# Altium PCB PCB.PcbDoc
Units mm, origin at the board's own origin, x right, y up, seen from the top; angles counter-clockwise.
Board outline 47.25 x 18.25 mm, 2 copper layers (Top Layer, Bottom Layer); 8 components, 7 nets, 24 pads, 1 vias.
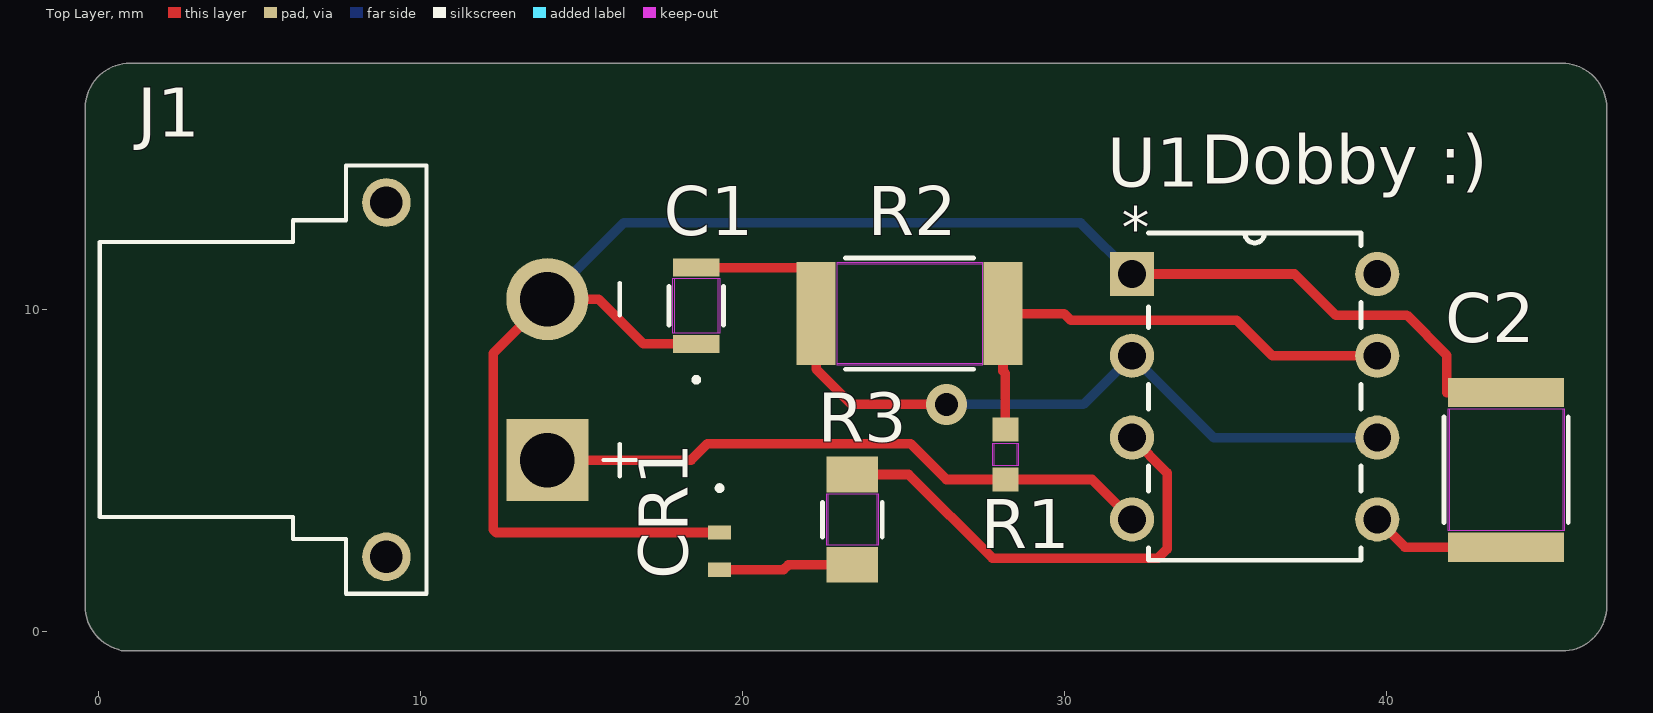
[diagram p0: Top Layer view]
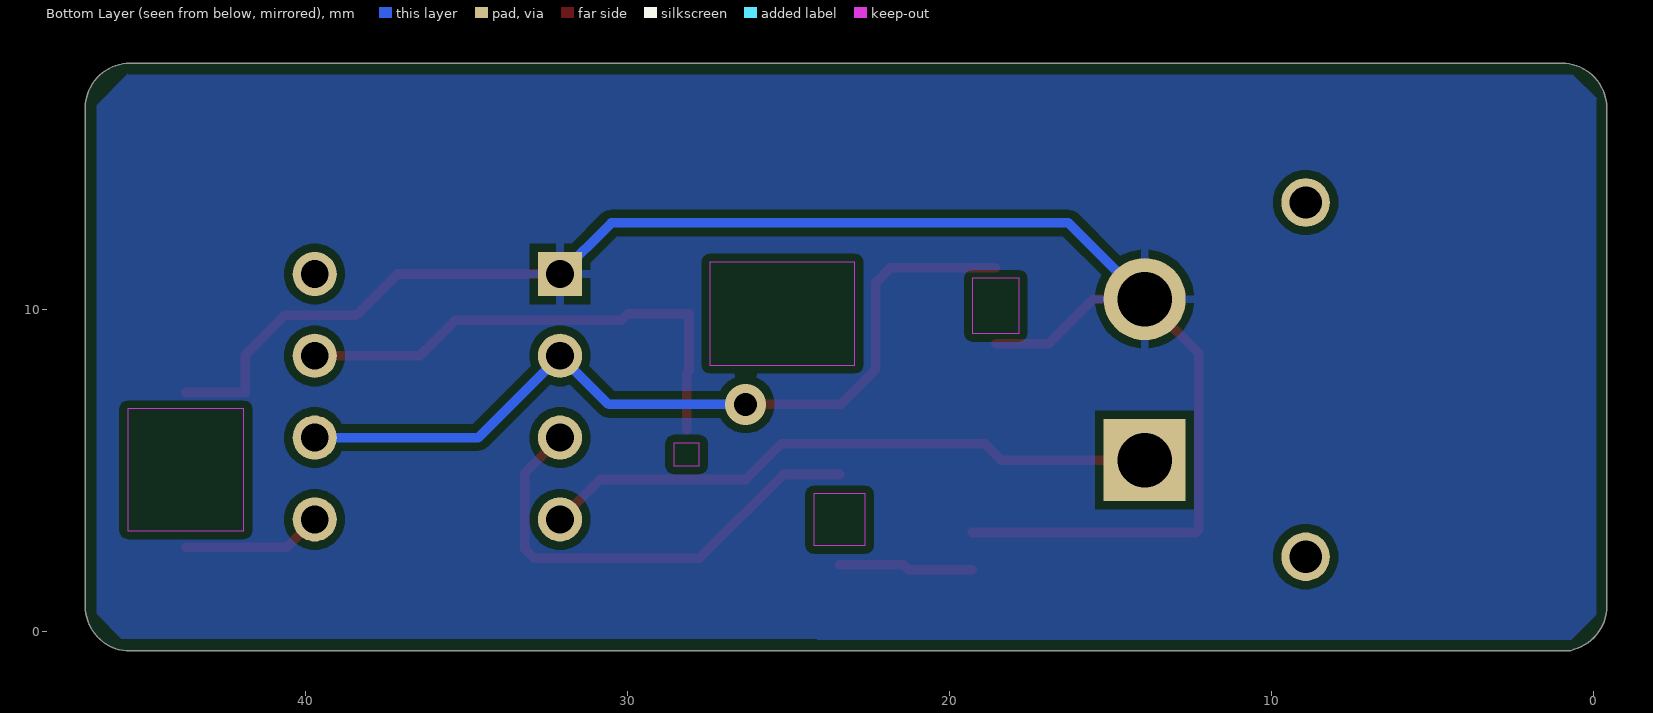
[diagram p1: Bottom Layer view, seen from below]
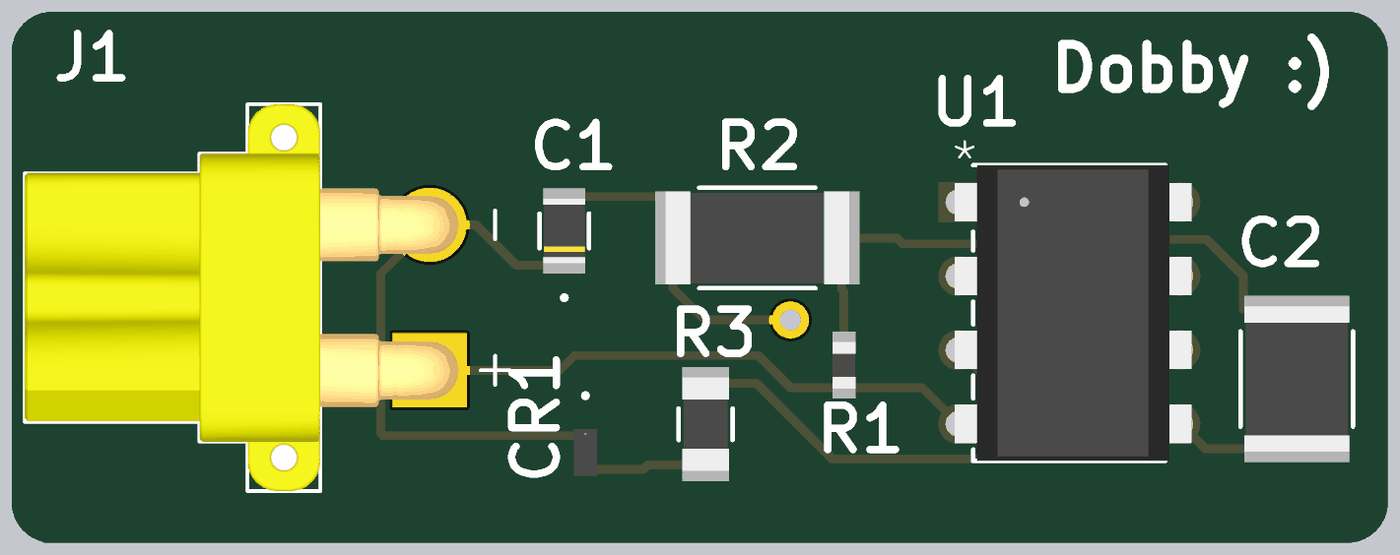
[diagram p2: 3D render of the assembled board from above, using the file's embedded part models]

## Layer stack, top to bottom
Top Solder: solder mask 0.0102, Solder Resist, Dk 3.5
Top Layer: signal copper 0.0356
Dielectric 1: dielectric 0.32, FR-4, Dk 4.8
Bottom Layer: signal copper 0.0356
Bottom Solder: solder mask 0.0102, Solder Resist, Dk 3.5

## Board outline
-0.427,0.795 ccw(c0.97,0.795) 0.599,-0.552 0.7,-0.602 45.43,-0.602 ccw(c45.43,0.795) 46.827,0.795 46.827,16.255 ccw(c45.43,16.255) 45.43,17.652 0.97,17.652 ccw(c0.97,16.255) -0.427,16.255

## Design rules (kind name [scope] priority, off if disabled: settings)
Clearance [All] p1: gap=0.05 ignorepadtopadclearanceinfootprint=FALSE
PolygonConnect [All] p1: connectstyle=Relief reliefconductorwidth=0.254 reliefentries=4 polygonreliefangle="90 Angle" airgapwidth=0.254
RoutingVias [All] p1: holewidth=0.711 width=1.27 viastyle="Through Hole" minholewidth=0.711 minwidth=1.27 maxholewidth=0.711 maxwidth=1.27
SilkToSilkClearance [All] p1: silktosilkclearance=0.02
SilkToSolderMaskClearance [IsPad] p1: minsilkscreentomaskgap=0.02 clearancetoexposedcopper=TRUE
SolderMaskExpansion [All] p1: expansion=0.102 istentingtop=FALSE
Width [All] p1: maxlimit=0.5 minlimit=0.05 preferedwidth=0.3
28 further rules are at their usual default settings.

## Components (designator, comment, footprint, x,y, rotation, side; value= is the part's Value field where it differs from the comment)
C1 "10 uF" CAP_2012_TDK 18.55,10.119 r90 top
C2 "0.01 uF" CAP_ECWU_E1_PAN 43.7,5.025 r270 top
CR1 "LED" LED_DIALIGHT_598_DIA 19.275,2.5 r270 top
J1 "XT30PW-F" AMASS_XT30PW-F 8.925,7.825 r270 top
R1 "3.9 K" RC0603N_PAN 28.15,5.5 r90 top
R2 "6.8 K" RC2512N_PAN 25.175,9.875 r180 top
R3 "1 K" RC1206N_PAN 23.4,3.475 r270 top
U1 "NE555P" P8 39.7,3.485 r0 top

## Footprints (in the part's own frame and the unit in brackets; to place one, negate y for a bottom-side part, rotate by r counter-clockwise, add the part's x,y. Pads: shape width x height; smd on the part's side, far side on the other; paste and mask are expansions set on the pad)
AMASS_XT30PW-F [mm]
  round 2.55 hole 1.7: N(-2.5,5)
  rect 2.55x2.55 / inner round 2.55 / far side rect 2.55x2.55 hole 1.7: P(2.5,5)
  round 1.508 hole 1: S1(5.5,0) S2(-5.5,0)
  silkscreen extent -6.65,-8.9 6.65,7.75, body extent -6.65,-8.9 6.65,6, height 5
CAP_2012_TDK [mil]
  rect 22x57 smd paste+0 mask+0: 1(-46.5,0) 2(46.5,0)
  Top Layer keep-out region: -33.5,-26.5 -33.5,26.5 33.5,26.5 33.5,-26.5
  Keep-Out Layer region: -33.5,-28.5 -33.5,28.5 33.5,28.5 33.5,-28.5
  silkscreen extent -93,-34 23,33, body extent -44,-29 44,29, height 49
CAP_ECWU_E1_PAN [mil]
  rect 36x142 smd paste+0 mask+0: 1(-94.5,0) 2(94.5,0)
  Top Layer keep-out region: -74.5,-69 -74.5,69 74.5,69 74.5,-69
  Keep-Out Layer region: -74.5,-71 -74.5,71 74.5,71 74.5,-71
  silkscreen extent -64,-76 64,76, body extent -99,-71 99,71, height 63
LED_DIALIGHT_598_DIA [mil]
  rect 17.5x28 smd paste+0 mask+0: 1(-22.75,0) 2(22.75,0)
  silkscreen extent -80,-3 -74,3, body extent -31,-16 31,16, height 28
P8 [mil]
  rect 54x54 / inner round 60 / far side rect 54x54 hole 34 paste-99999 mask-27: 1(-300,300)
  round 54 / inner round 60 / far side round 54 hole 34 paste-99999 mask-27: 2(-300,200) 3(-300,100) 4(-300,0) 5(0,0) 6(0,100) 7(0,200) 8(0,300)
  silkscreen extent -280,-50 -20,350, body extent -305,-50 15,350, height 205
RC0603N_PAN [mm]
  rect 0.75x0.8 smd paste+0 mask+0: 1(-0.775,0) 2(0.775,0)
  Top Layer keep-out region: -0.349,-0.349 -0.349,0.349 0.349,0.349 0.349,-0.349
  Keep-Out Layer region: -0.349,-0.4 -0.349,0.4 0.349,0.4 0.349,-0.4
  body extent -0.8,-0.4 0.8,0.4, height 0.71
RC1206N_PAN [mm]
  rect 1.106x1.6 smd paste+0 mask+0: 1(-1.403,0) 2(1.403,0)
  Top Layer keep-out region: -0.799,-0.749 -0.799,0.749 0.799,0.749 0.799,-0.749
  Keep-Out Layer region: -0.799,-0.8 -0.799,0.8 0.799,0.8 0.799,-0.8
  silkscreen extent -0.54,-0.93 0.54,0.93, body extent -1.6,-0.8 1.6,0.8, height 0.71
RC2512N_PAN [mm]
  rect 1.206x3.2 smd paste+0 mask+0: 1(-2.903,0) 2(2.903,0)
  Top Layer keep-out region: -2.249,-1.549 -2.249,1.549 2.249,1.549 2.249,-1.549
  Keep-Out Layer region: -2.249,-1.6 -2.249,1.6 2.249,1.6 2.249,-1.6
  silkscreen extent -1.99,-1.73 1.99,1.73, body extent -3.15,-1.6 3.15,1.6, height 0.71

## Part data
C1: library part C2012X5R1C106K085AC, "Description", Manufacturer_Name=TDK, Copyright="Copyright (C) 2025 Ultra Librarian. All rights reserved.", Manufacturer_Part_Number=C2012X5R1C106K085AC
C2: library part ECW-U2103KC9, "Description", Manufacturer_Name=Panasonic, Copyright="Copyright (C) 2026 Ultra Librarian. All rights reserved.", Manufacturer_Part_Number=ECW-U2103KC9
CR1: library part 598-8050-107F, "Description", Manufacturer_Name=Dialight, Copyright="Copyright (C) 2026 Ultra Librarian. All rights reserved.", Manufacturer_Part_Number=598-8050-107F
J1: "Socket; DC supply; XT30; female; PIN: 2; on PCBs; THT; yellow; 15A", Package=None, Check_prices=https://www.snapeda.com/parts/XT30PW-F/AMASS/view-part/?ref=eda, MF=amass, MP=XT30PW-F, SnapEDA_Link=https://www.snapeda.com/parts/XT30PW-F/AMASS/view-part/?ref=snap
R1: library part ERJ-3GEYJ392V, "No Description Available", Manufacturer_Name=Panasonic, Copyright="Copyright (C) 2026 Ultra Librarian. All rights reserved.", Manufacturer_Part_Number=ERJ-3GEYJ392V
R2: library part ERJ-1TYJ683U, "Description", Manufacturer_Name=Panasonic, Copyright="Copyright (C) 2025 Ultra Librarian. All rights reserved.", Manufacturer_Part_Number=ERJ-1TYJ683U
R3: library part ERJ-P08J102V, "Description", Manufacturer_Name=Panasonic, Copyright="Copyright (C) 2025 Ultra Librarian. All rights reserved.", Manufacturer_Part_Number=ERJ-P08J102V
U1: "Single Precision Timer 8-PDIP 0 to 70", Manufacturer_Name="Texas Instruments", Copyright="Copyright (C) 2025 Ultra Librarian. All rights reserved.", Manufacturer_Part_Number=NE555P, RefDes=RefDes, Type=Type

## Via types
v1: diameter 1.27, hole 0.711, Top Layer to Bottom Layer, 1 vias

## Nets (pads, with @x,y where several pads share a name; then routed paths per layer and width w, separated by ;. In a path a pad name is that pad's centre, name@x,y a point inside that pad or via, vN(x,y) a via of type N, cw(c..) or ccw(c..) an arc to the next point about the centre after c; other vN are vias at no path point)
GND: C1.1 C2.1 CR1.1 J1.N U1.1 | length 53.7
  Top Layer w0.3: C1.1 16.907,8.938 15.52,10.325 J1.N 12.244,8.644 12.244,3.171 12.336,3.078 CR1.1 ; U1.1 37.126,11.105 38.406,9.825 40.615,9.825 41.86,8.581 41.86,7.425 C2.1
  Bottom Layer w0.3: J1.N 16.296,12.696 30.489,12.696 U1.1
NetC1_2: C1.2 R2.2 U1.2 U1.6 | length 26.2
  Top Layer w0.3: C1.2 21.819,11.3 22.272,10.847 R2.2 22.272,8.149 23.364,7.057 v1(26.315,7.057)
  Bottom Layer w0.3: v1(26.315,7.057) 30.572,7.057 U1.2 34.62,6.025 U1.6
NetC2_2: C2.2 U1.5 | length 4.4
  Top Layer w0.3: U1.5 40.56,2.625 C2.2
NetCR1_2: CR1.2 R3.2 | length 4.2
  Top Layer w0.3: CR1.2 21.261,1.922 21.411,2.072 R3.2
NetR1_2: R1.2 R2.1 U1.7 | length 15.8
  Top Layer w0.3: R1.2 28.15,8.022 28.078,8.094 R2.1 29.973,9.875 30.175,9.673 35.332,9.673 36.44,8.565 U1.7
NetR3_1: R3.1 U1.3 | length 14.9
  Top Layer w0.3: R3.1 25.147,4.878 27.743,2.282 32.894,2.282 33.173,2.561 33.173,4.932 U1.3
VCC: J1.P R1.1 U1.4 | length 19.3
  Top Layer w0.3: J1.P 18.386,5.325 18.898,5.838 25.203,5.838 26.315,4.725 R1.1 30.84,4.725 U1.4
pads on no net: J1.S1 J1.S2 U1.8

## Polygon pours and split planes (outlines as drawn)
GND on Bottom Layer "GND_L02_P000" (solid, pour order 0): 24.1,-0.225 45.7,-0.225 46.475,0.55 46.475,16.35 45.5,17.325 45.475,17.3 0.625,17.3 -0.125,16.55 -0.1,16.525 -0.1,0.525 0.675,-0.25 24.1,-0.25

## Silkscreen, mask and mechanical layers (free items; w line width, h text height)
Top Overlay:
  text "Dobby :)" at 34.212,13.909 h1.52
Mechanical 1:
  lines w0.254: 0.7,-0.475 20.7,-0.475 45.43,-0.475 ccw(c45.43,0.795) 46.7,0.795 46.7,16.255 ccw(c45.43,16.255) 45.43,17.525 0.97,17.525 ccw(c0.97,16.255) -0.3,16.255 -0.3,0.795 ccw(c0.97,0.795) 0.97,-0.475

## Text inside footprints (layer, text, board x,y; h text height)
U1: Top Overlay "*" at 31.763,11.918 h1.27; Mechanical 13 "*" at 31.763,11.918 h1.27